# Altium PCB PCB1.PcbDoc (part 1 of 3)
Units mm, origin at the board's own origin, x right, y up, seen from the top; angles counter-clockwise.
Board outline 100 x 48 mm, 4 copper layers (Top Layer, Top GND, Bottom VM, Bottom Layer), stack 1.513 mm thick; 171 components, 136 nets, 609 pads, 571 vias.
Unrouted connection lines stored in the file: 44.
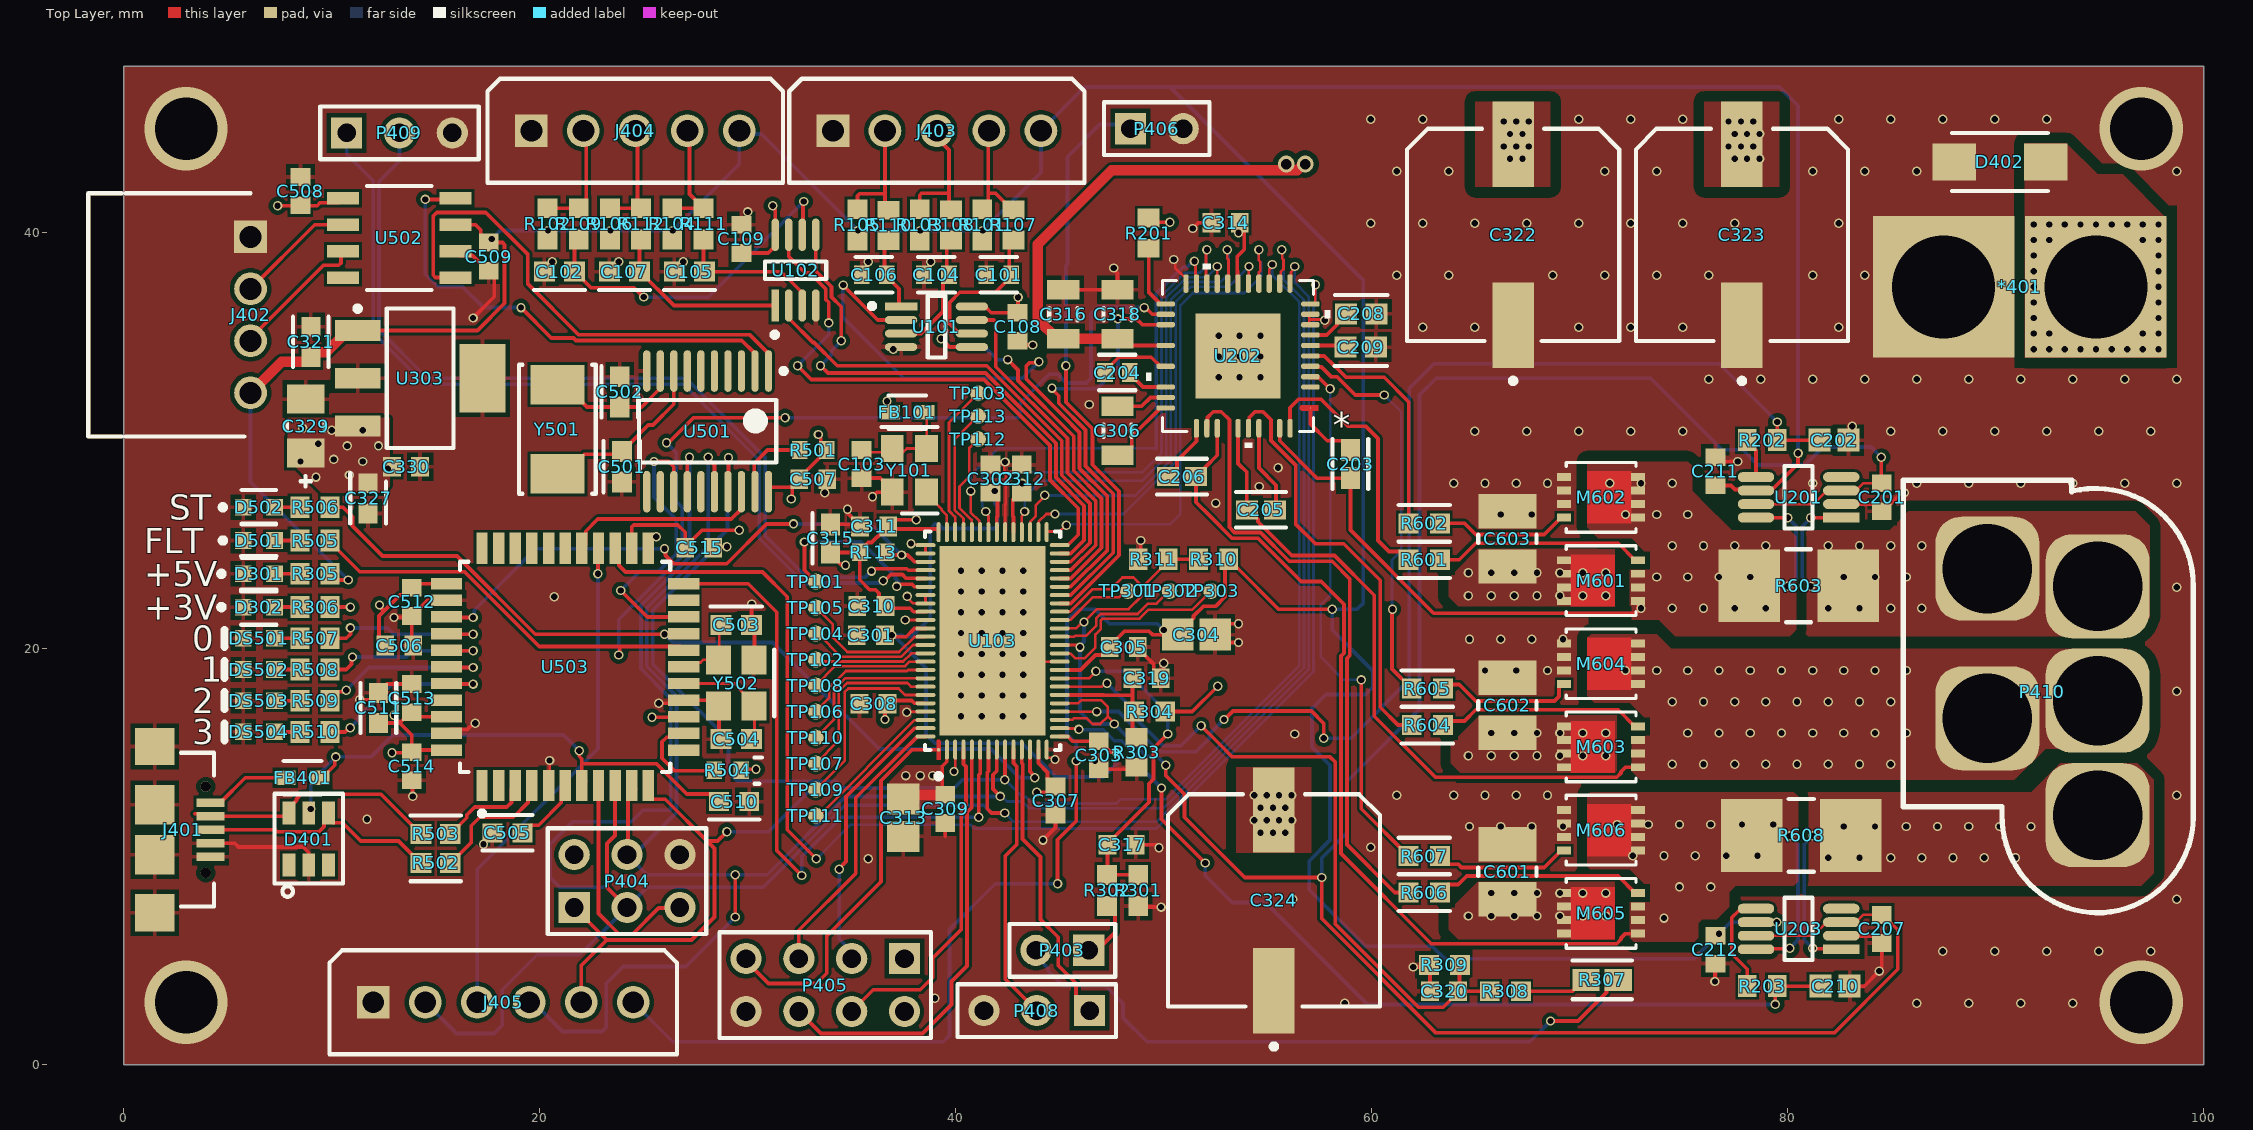
[diagram p0: Top Layer view]
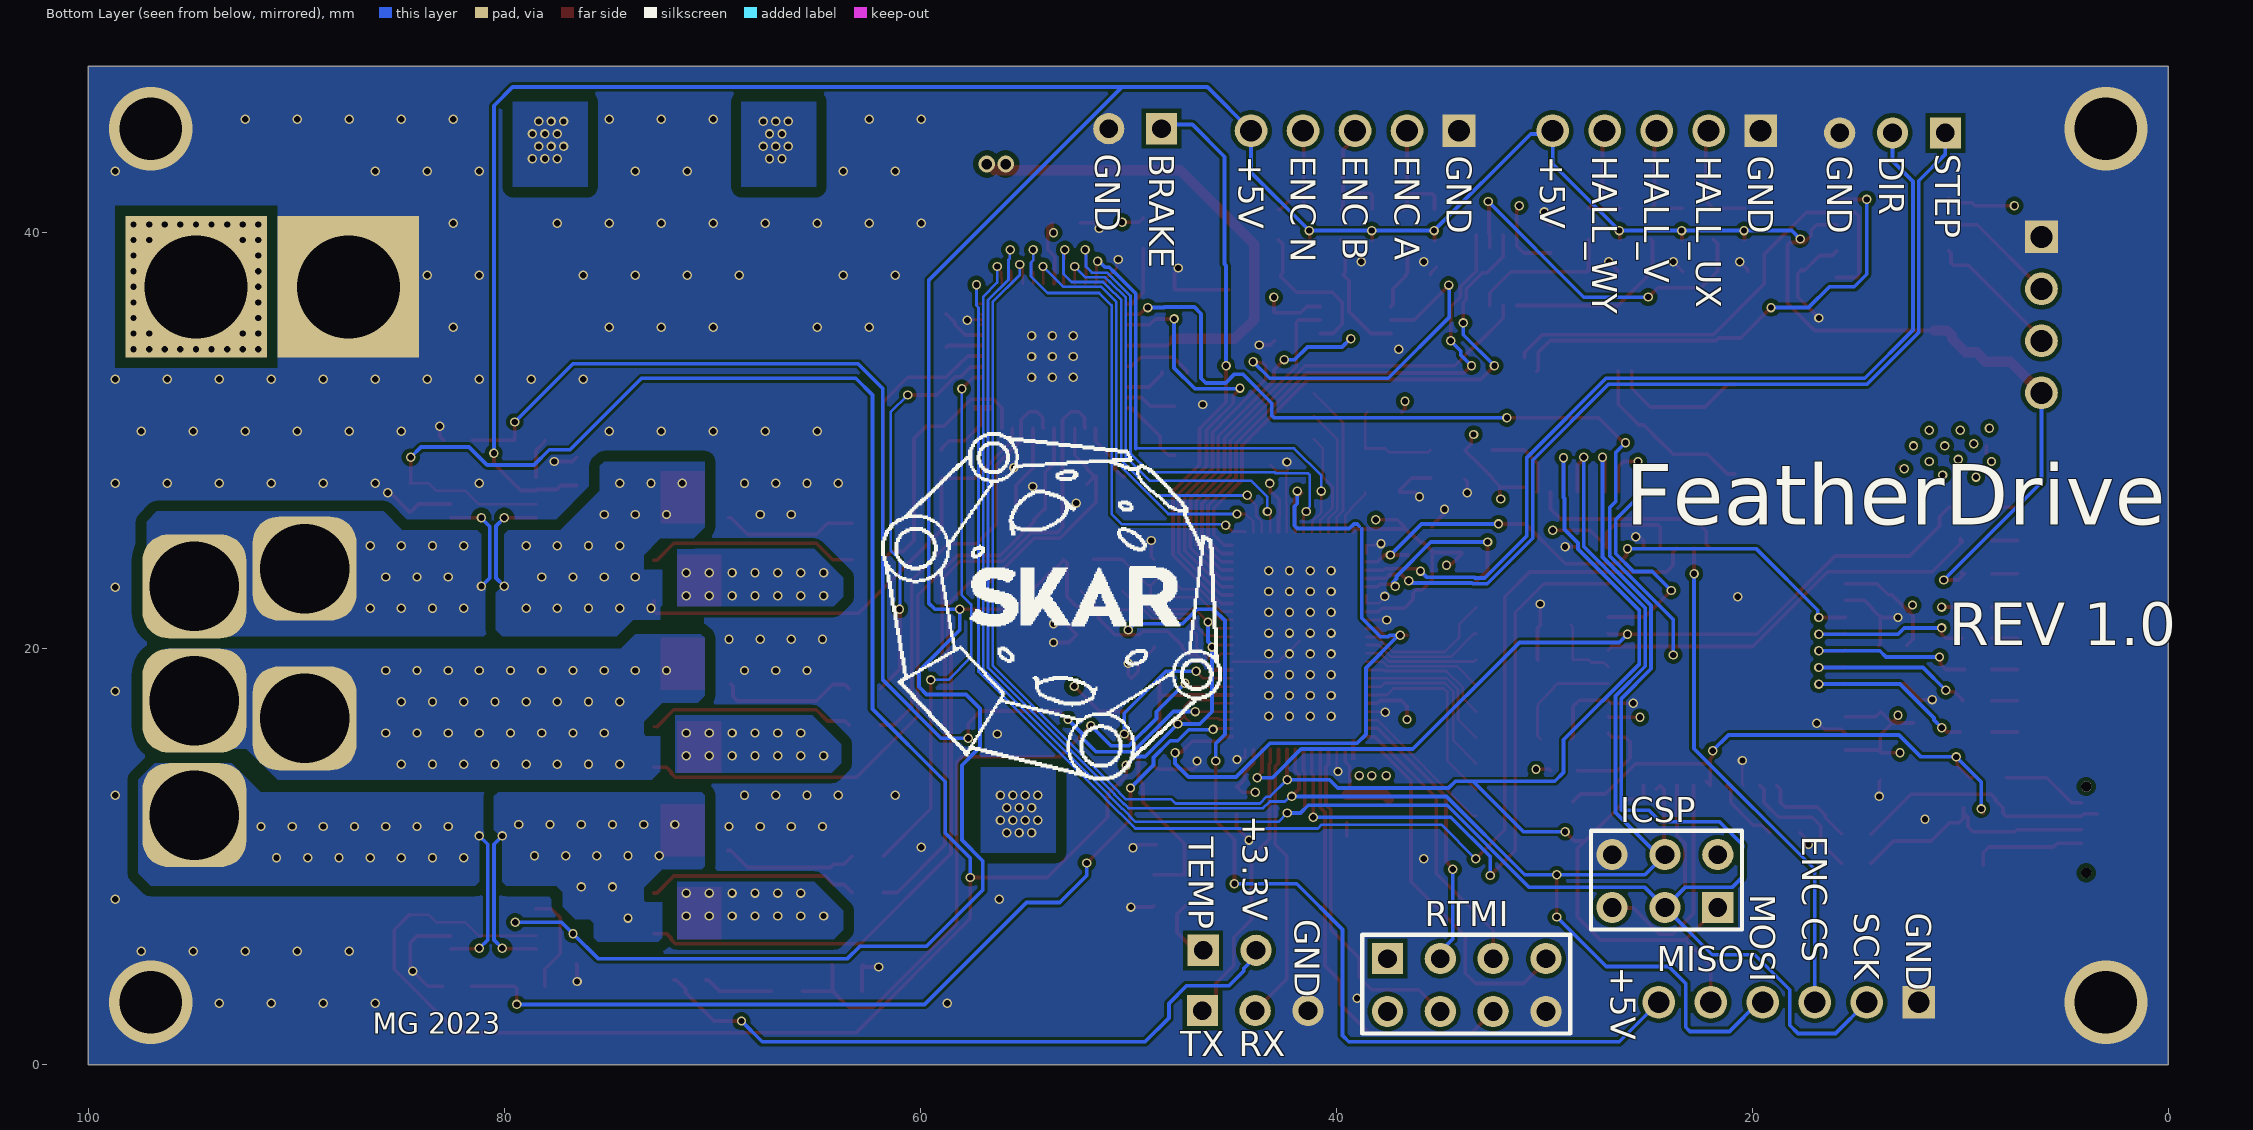
[diagram p1: Bottom Layer view, seen from below]
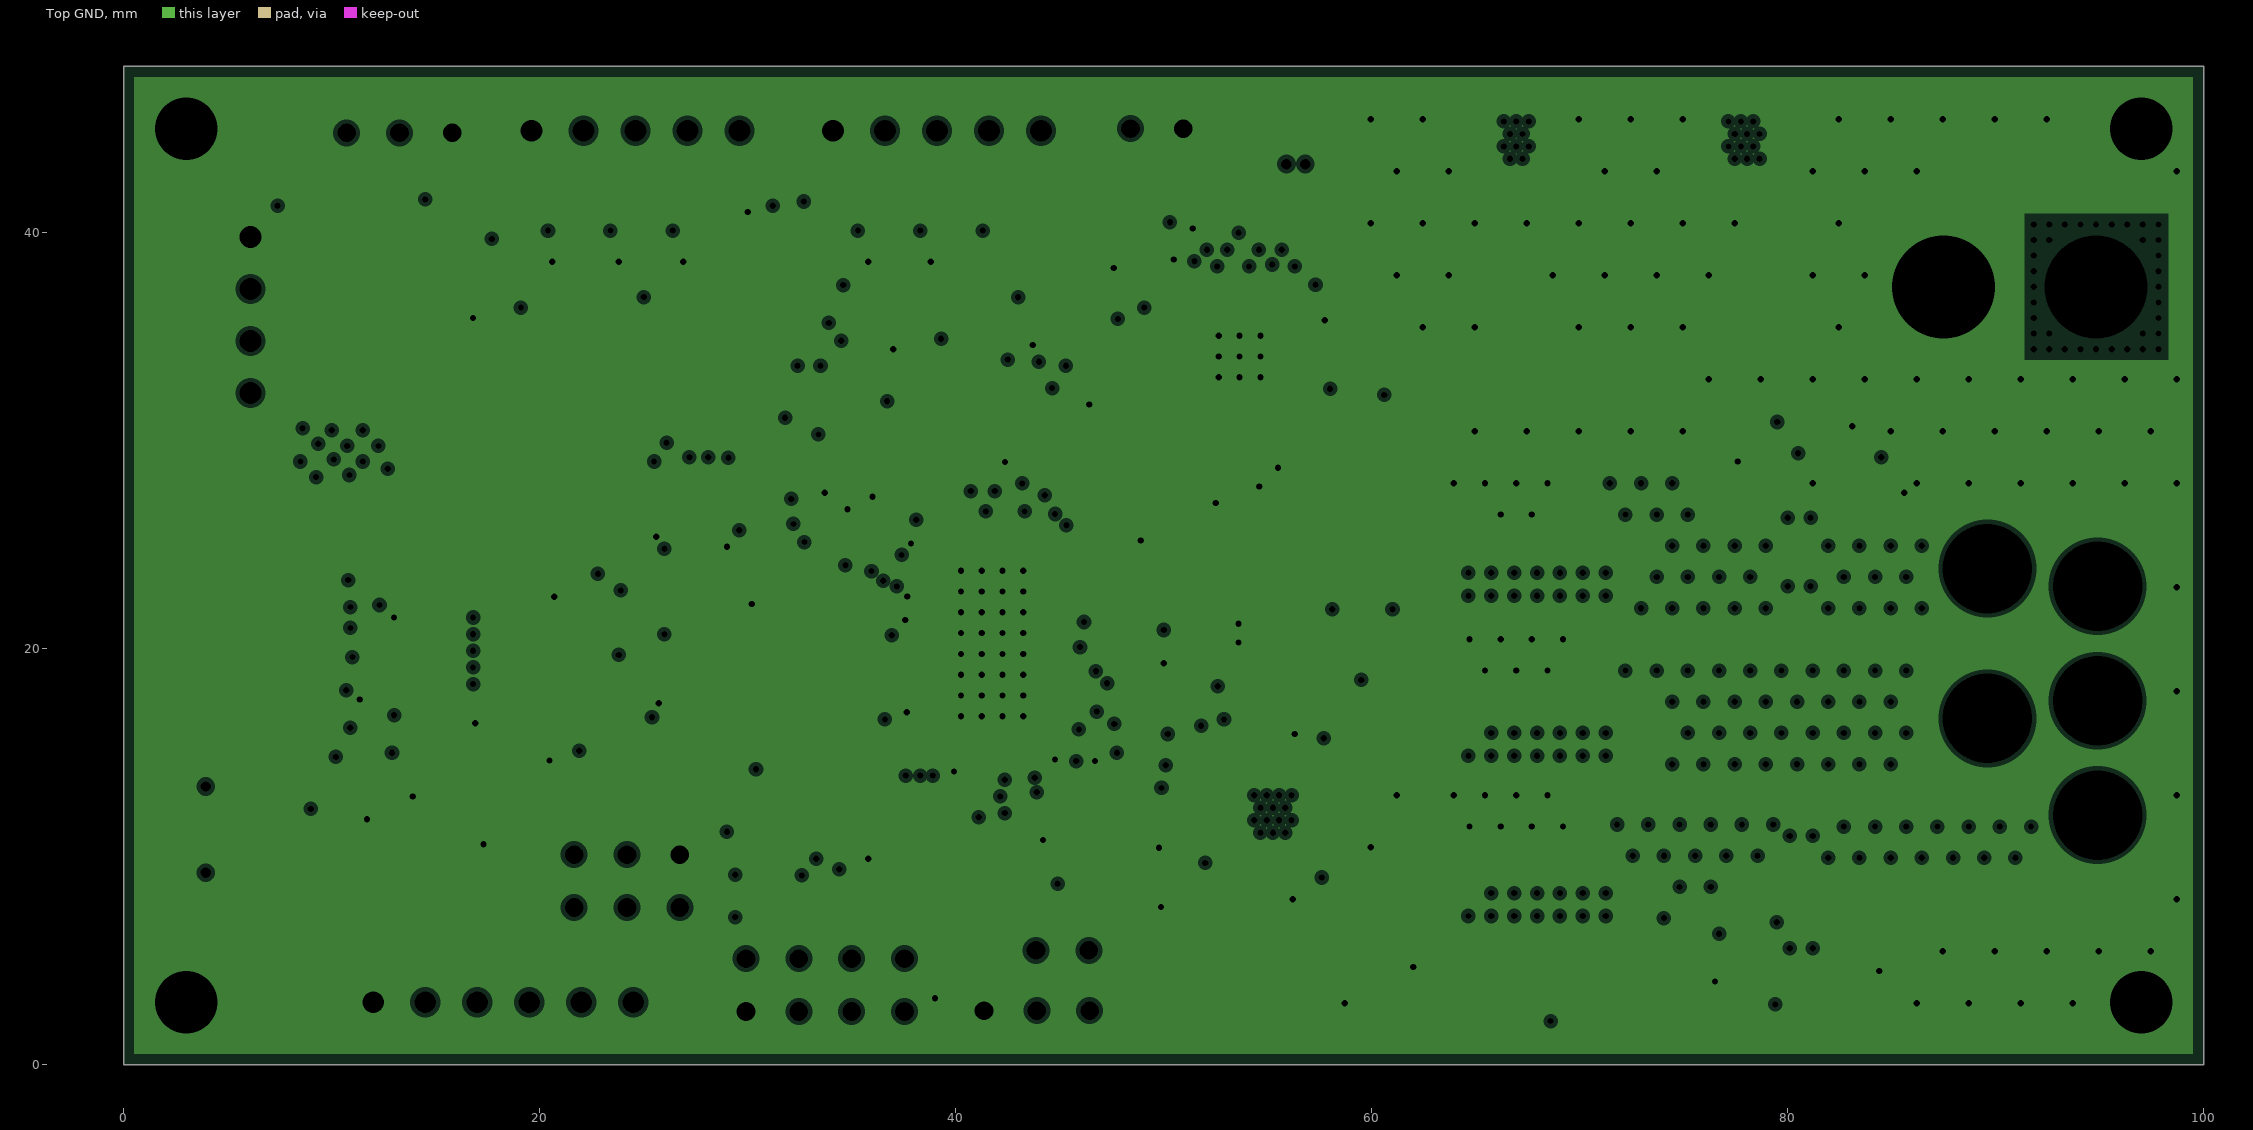
[diagram p2: Top GND, clearances drawn from the general rule]
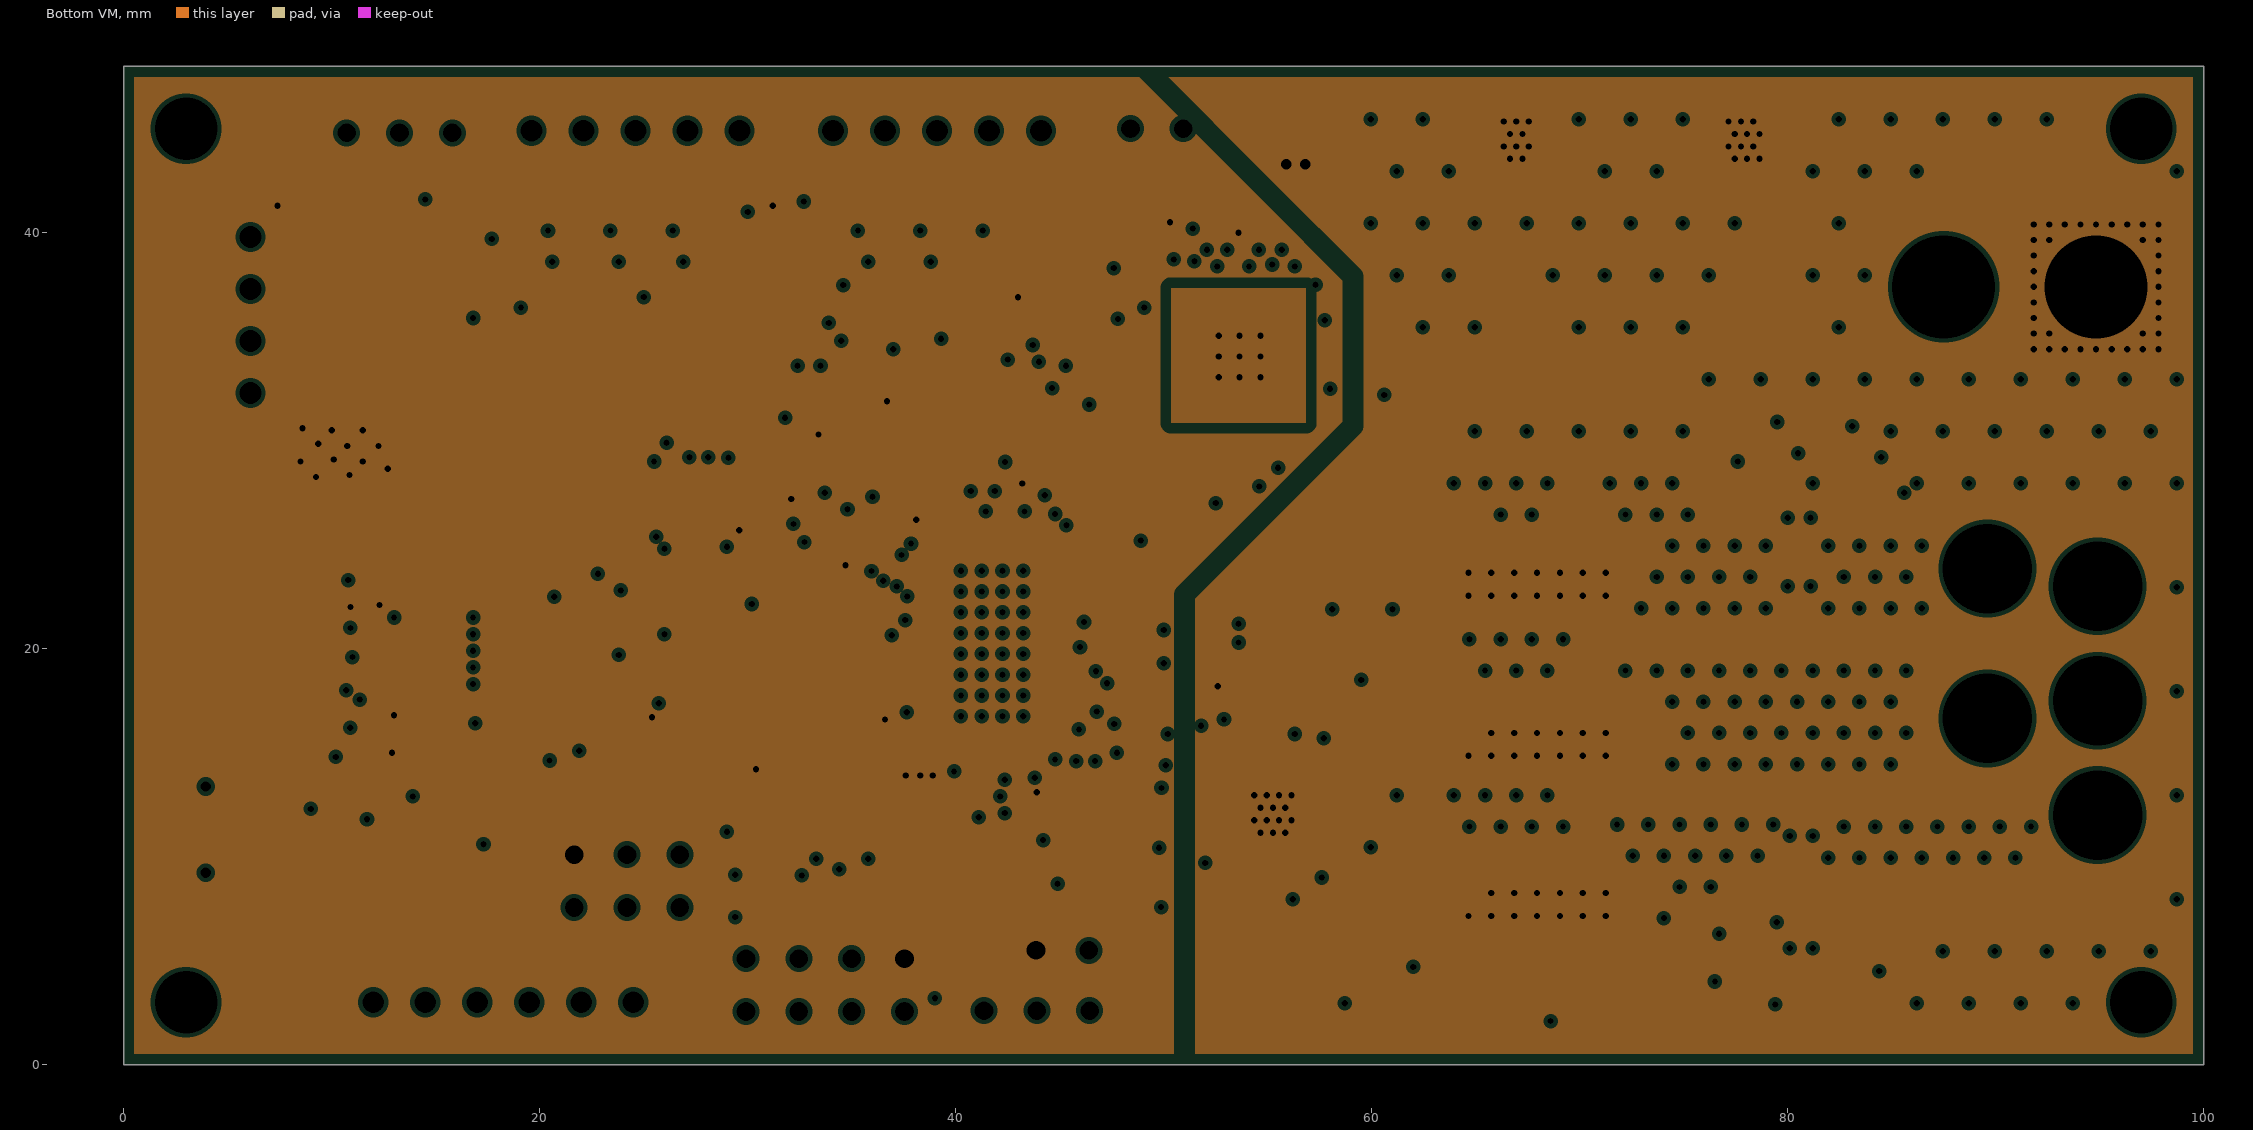
[diagram p3: Bottom VM, clearances drawn from the general rule]
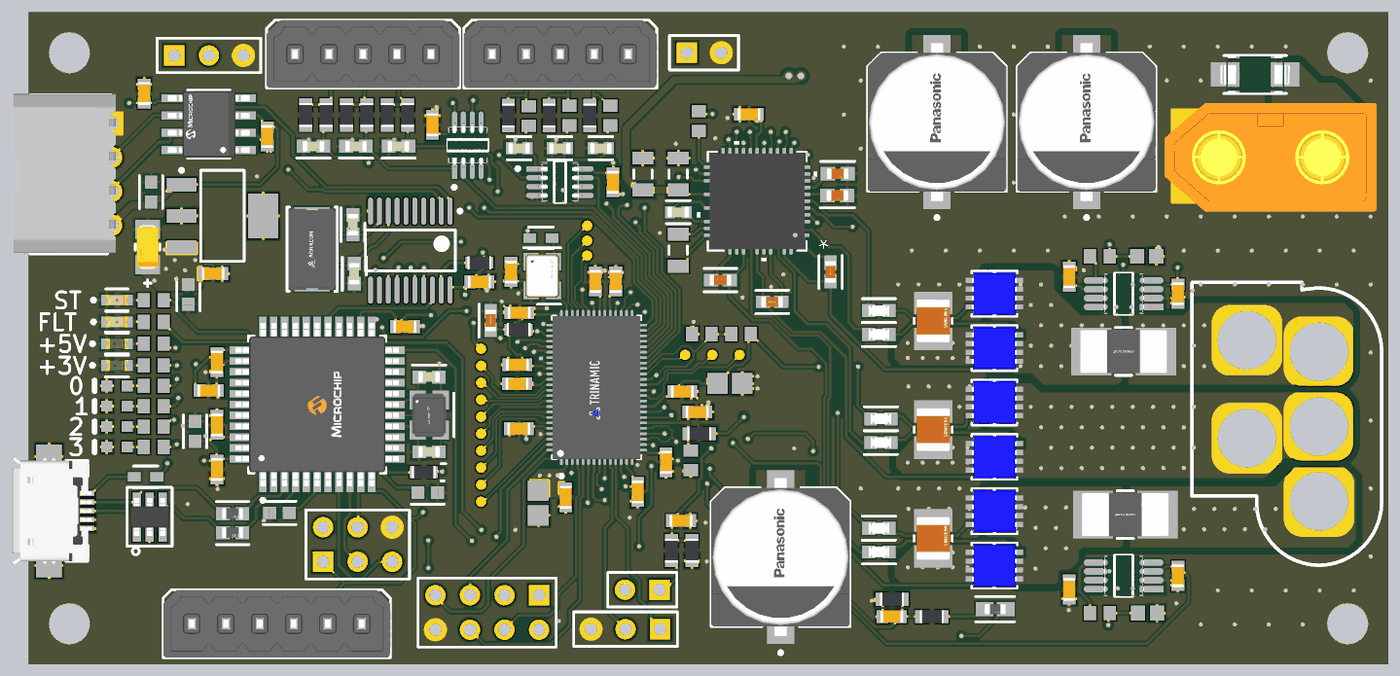
[diagram p6: 3D render of the assembled board from above, using the file's embedded part models]

## Layer stack, top to bottom
Top Solder: solder mask 0.0102, Solder Resist, Dk 3.5
Top Layer: signal copper 0.035
Dielectric 2: prepreg 0.2083, PP-022, Dk 4.5
Top GND: plane copper 0.018, net GND
Core: core 0.9906, Core-042, Dk 4.6
Bottom VM: plane copper 0.018, net (Multiple Nets)
Dielectric 3: prepreg 0.2083, PP-022, Dk 4.5
Bottom Layer: signal copper 0.035
Bottom Solder: solder mask 0.0102, Solder Resist, Dk 3.5

## Board outline
0,0 0,48 100,48 100,0

## Design rules (kind name [scope] priority, off if disabled: settings)
Clearance Clearance_POWER [(InNet('NetC205_2') OR InNet('NETC203_2') OR InNet('NETC206_2') OR InNet('NetP410_1') OR InNet('NetP410_3') OR InNet('VM'))] p1: gap=0.254 ignorepadtopadclearanceinfootprint=FALSE except(0: SMDPad-Hole THPad-Hole Via-Hole Fill-Hole Poly-Hole Region-Hole Text-Hole; 0.1: Arc-Arc Arc-Track Track-Track; 0.127: Arc-THPad Arc-Fill Arc-Poly Arc-Region Track-THPad Track-Fill Track-Poly Track-Region SMDPad-SMDPad; 0.2: Arc-SMDPad Track-SMDPad; 0.5: THPad-THPad THPad-Fill THPad-Poly THPad-Region Fill-Fill Fill-Poly Fill-Region Poly-Poly Poly-Region Region-Region)
Clearance [All] p2: gap=0.127 ignorepadtopadclearanceinfootprint=FALSE except(0: SMDPad-Hole THPad-Hole Via-Hole Fill-Hole Poly-Hole Region-Hole Text-Hole; 0.1: Arc-Arc Arc-Track Track-Track; 0.2: Arc-SMDPad Track-SMDPad THPad-Fill THPad-Poly THPad-Region Via-Fill Via-Poly Via-Region; 0.254: Arc-Via Arc-Text Arc-Hole Track-Via Track-Text Track-Hole SMDPad-THPad SMDPad-Via SMDPad-Text THPad-Via THPad-Text Via-Via Via-Text Fill-Text Poly-Text Region-Text Text-Text; 0.5: THPad-THPad)
ComponentClearance [All] p1: gap=0.127 collisioncheckmode=3 verticalgap=0.254 showdistances=FALSE
HoleSize [All] p1: absolutevalues=TRUE maxlimit=6.5 minlimit=0.025 maxpercent=80.000 minpercent=20.000
MinimumSolderMaskSliver [All] p1: minsoldermaskwidth=0.08
PlaneClearance [All] p1: clearance=0.2
PlaneConnect [All] p1: planeconnectstyle=Direct reliefexpansion=0.508 reliefentries=4 reliefconductorwidth=0.254 reliefairgap=0.254
PolygonConnect PolygonConnect_GND_POWER [InNet('GND') vs (HasFootprint('FP-FC-G-MFG') OR HasFootprint('FP-CL32-IPC_B') OR HasFootprint('TSON Advance_TOS') OR HasFootprint('XT60+MR60') OR HasFootprint('XT-60') OR HasFootprint('FP-SMAJ-CA-MFG') OR InNamedPolygon('GND_L01_P000'))] p1: connectstyle=Direct reliefconductorwidth=0.254 reliefentries=4 polygonreliefangle="90 Angle" airgapwidth=0.254
PolygonConnect PolygonConnect_GND [InNet('GND')] p2: thpad.connectstyle=Direct thpad.reliefconductorwidth=0.254 thpad.reliefentries=4 thpad.polygonreliefangle="90 Angle" thpad.airgapwidth=0.254 smdpad.connectstyle=Relief smdpad.reliefconductorwidth=0.2 smdpad.reliefentries=4 smdpad.polygonreliefangle="90 Angle" smdpad.airgapwidth=0.2 via.connectstyle=Direct via.reliefconductorwidth=0.254 via.reliefentries=4 via.polygonreliefangle="90 Angle" via.airgapwidth=0.254
PolygonConnect [All] p3: connectstyle=Direct reliefconductorwidth=0.254 reliefentries=4 polygonreliefangle="90 Angle" airgapwidth=0.254
RoutingVias [All] p1: holewidth=0.3 width=0.45 viastyle="Through Hole" minholewidth=0.3 minwidth=0.45 maxholewidth=0.55 maxwidth=0.7
SilkToSilkClearance [All] p1: silktosilkclearance=0
SilkToSolderMaskClearance [IsPad] p1: minsilkscreentomaskgap=0.15 clearancetoexposedcopper=TRUE
SolderMaskExpansion [All] p1: expansion=0.1 istentingtop=FALSE
Width Width_voltage [InNetClass('Voltage')] p1: maxlimit=0.5 minlimit=0.18 preferedwidth=0.18 minimp=50.000000 maximp=50.000000 favimp=50.000000
Width [All] p2: maxlimit=0.5 minlimit=0.127 preferedwidth=0.18 minimp=50.000000 maximp=50.000000 favimp=50.000000
23 further rules are at their usual default settings.

## Classes and differential pairs
component class Designator: C201 C202 C203 C204 C205 C206 C207 C208 C209 C210 C211 C212 R201 R202 R203 U201 U202 U203
component class Designator: C601 C602 C603 M601 M602 M603 M604 M605 M606 R601 R602 R603 R604 R605 R606 R607 R608
component class Designator: C101 C102 C103 C104 C105 C106 C107 C108 C109 FB101 R101 R102 R103 R104 R105 R106 R107 R108 R109 R110 R111 R112 R113 TP101 TP102 TP103 TP104 TP105 TP106 TP107 TP108 TP109 TP110 TP111 TP112 TP113 U101 U102 U103 Y101

## Components (designator, comment, footprint, x,y, rotation, side; value= is the part's Value field where it differs from the comment)
*401 "XT-60 Connector" XT-60 99.209,41.439 r180 top
C101 "1nF" FP-C0603C-CF-MFG 42.077,37.977 r180 top value="1,000 pF"
C102 "100pF" FP-C0603C-CF-IPC_B 20.951,38.127 r180 top value="100 pF"
C103 "100nF" CAPC1608X90X35NL10T15 35.477,28.877 r270 top
C104 "1nF" FP-C0603C-CF-MFG 39.077,37.977 r180 top value="1,000 pF"
C105 "100pF" FP-C0603C-CF-IPC_B 27.203,38.127 r180 top value="100 pF"
C106 "1nF" FP-C0603C-CF-MFG 36.077,37.977 r180 top value="1,000 pF"
C107 "100pF" FP-C0603C-CF-IPC_B 24.077,38.127 r180 top value="100 pF"
C108 "100nF" CAPC1608X90X35NL10T15 42.977,35.477 r270 top
C109 "100nF" CAPC1608X90X35NL10T15 29.7,39.7 r90 top
C201 "100nF" CAPC1608X90X35NL10T15 84.527,27.277 r270 top
C202 "2.2nF" CAPC1608X95X40ML15T15 82.227,30.027 r180 top
C203 "470nF" FP-0603-L_1_6_0_1-W_0_8_0-IPC_B 58.977,28.877 r270 top
C204 "22nF" FP-C0603C-CF-MFG 47.777,33.277 r180 top value="22,000 pF"
C205 "470nF" FP-0603-L_1_6_0_1-W_0_8_0-IPC_B 54.677,26.677 r180 top
C206 "470nF" FP-0603-L_1_6_0_1-W_0_8_0-IPC_B 50.877,28.277 r0 top
C207 "100nF" CAPC1608X90X35NL10T15 84.527,6.527 r270 top
C208 "2.2uF" FP-0603-L_1_6_0_2-W_0_8_0-IPC_B 59.5,36.1 r0 top
C209 "2.2uF" FP-0603-L_1_6_0_2-W_0_8_0-IPC_B 59.473,34.5 r0 top
C210 "2.2nF" CAPC1608X95X40ML15T15 82.277,3.777 r180 top
C211 "100nF" CAPC1608X90X35NL10T15 76.527,28.527 r90 top
C212 "100nF" CAPC1608X90X35NL10T15 76.527,5.527 r270 top
C301 "100nF" CAPC1608X90X35NL10T15 35.925,20.65 r0 top
C302 "100nF" CAPC1608X90X35NL10T15 41.677,28.177 r270 top
C303 "100nF" CAPC1608X90X35NL10T15 46.877,14.877 r90 top
C304 "4.7uF" CAPC2013X145X50ML20T25 51.577,20.677 r180 top
C305 "100nF" CAPC1608X90X35NL10T15 48.077,20.077 r180 top
C306 "100nF" CAPC2013X145X20ML20 47.777,30.477 r90 top
C307 "100nF" CAPC1608X90X35NL10T15 44.8,12.7 r90 top
C308 "100nF" CAPC1608X90X35NL10T15 36.05,17.35 r0 top
C309 "100nF" CAPC1608X90X35NL10T15 39.5,12.3 r90 top
C310 "100nF" CAPC1608X90X35NL10T15 35.95,22.05 r0 top
C311 "100nF" CAPC1608X90X35NL10T15 36.077,25.877 r0 top
C312 "100nF" CAPC1608X90X35NL10T15 43.177,28.177 r270 top
C313 "4.7uF" CAPC2013X145X50ML20T25 37.477,11.877 r90 top
C314 "100nF" CAPC1608X90X35NL10T15 52.977,40.477 r0 top
C315 "470nF" FP-0603-L_1_6_0_1-W_0_8_0-IPC_B 33.977,25.304 r270 top
C316 "100nF" CAPC2013X145X20ML20 45.177,36.077 r90 top
C317 "100nF" CAPC1608X90X35NL10T15 47.977,10.577 r180 top
C318 "100nF" CAPC2013X145X20ML20 47.777,36.077 r90 top
C319 "100nF" CAPC1608X90X35NL10T15 49.177,18.577 r180 top
C320 "100nF" CAPC1608X90X35NL10T15 63.477,3.527 r0 top
C321 "1uF" FP-CL10-IPC_B 9,34.75 r90 top
C322 "390uF" FP-FC-G-MFG 66.8,39.9 r90 top locked
C323 "390uF" FP-FC-G-MFG 77.8,39.9 r90 top locked
C324 "390uF" FP-FC-G-MFG 55.3,7.9 r90 top locked
C327 "1uF" FP-CL10-IPC_B 11.75,27.227 r270 top
C329 "10uF" FP-TAJA-MFG 8.75,30.7 r270 top
C330 "100nF" CAPC1608X90X35NL10T15 13.575,28.75 r180 top
C501 "18pF" FP-C0603C-CF-IPC_B 23.95,28.75 r90 top value="18 pF"
C502 "18pF" FP-C0603C-CF-IPC_B 23.85,32.35 r90 top value="18 pF"
C503 "18pF" FP-C0603C-CF-IPC_B 29.45,21.15 r0 top value="18 pF"
C504 "18pF" FP-C0603C-CF-IPC_B 29.45,15.65 r180 top value="18 pF"
C505 "1uF" FP-CL10-IPC_B 18.45,11.15 r0 top
C506 "100nF" CAPC1608X90X35NL10T15 13.25,20.15 r0 top
C507 "100nF" CAPC1608X90X35NL10T15 33.15,28.15 r180 top
C508 "100nF" CAPC1608X90X35NL10T15 8.5,42 r270 top
C509 "100nF" CAPC1608X90X35NL10T15 17.55,38.85 r90 top
C510 "1uF" FP-CL10-IPC_B 29.35,12.65 r0 top
C511 "1uF" FP-CL10-IPC_B 12.25,17.15 r90 top
C512 "100nF" CAPC1608X90X35NL10T15 13.85,22.25 r90 top
C513 "100nF" CAPC1608X90X35NL10T15 13.85,17.625 r270 top
C514 "100nF" CAPC1608X90X35NL10T15 13.85,14.35 r90 top
C515 "100nF" CAPC1608X90X35NL10T15 27.675,24.85 r180 top
C601 "2.2uF" FP-CL32-IPC_B 66.527,9.277 r90 top
C602 "2.2uF" FP-CL32-IPC_B 66.527,17.277 r90 top
C603 "2.2uF" FP-CL32-IPC_B 66.527,25.277 r90 top
D301 "GREEN" FP-LTST-C190GKT-MFG 6.5,23.6 r0 top
D302 "GREEN" FP-LTST-C190GKT-MFG 6.5,22 r0 top
D401 "824001" SOT23_6L 8.9,10.85 r90 top
D402 "SMAJ36CA" FP-SMAJ-CA-MFG 90.2,43.4 r0 top
D501 "RED" FP-LTST-C190KRKT-MFG 6.5,25.2 r0 top
D502 "RED" FP-LTST-C190KRKT-MFG 6.5,26.8 r0 top
DS501 "LTST-C190TBKT" LTST-C190TBKT-2_V 6.5,20.5 r180 top
DS502 "LTST-C190TBKT" LTST-C190TBKT-2_V 6.5,19 r180 top
DS503 "LTST-C190TBKT" LTST-C190TBKT-2_V 6.5,17.5 r180 top
DS504 "LTST-C190TBKT" LTST-C190TBKT-2_V 6.5,16 r180 top
FB101 "600R" FP-742792651-MFG 37.677,31.377 r0 top
FB401 "600R" FP-742792651-MFG 8.6,13.8 r180 top
J401 "629105136821" 629105136821 1.5,11.3 r270 top
J402 "CAN" SHDRRA4W60P0X250_1X4_1170X750X510P 6.1,39.8 r90 top
J403 "ENCODER" PTSM5 34.1,44.9 r180 top
J404 "HALL" PTSM5 19.6,44.9 r180 top
J405 "ENC_SPI" PTSM6 12,3 r180 top
M601 "TPN19008QM" "TSON Advance_TOS" 71.027,23.277 r180 top locked
M602 "TPN19008QM" "TSON Advance_TOS" 71.027,27.277 r0 top locked
M603 "TPN19008QM" "TSON Advance_TOS" 71.027,15.277 r180 top locked
M604 "TPN19008QM" "TSON Advance_TOS" 71.027,19.277 r0 top locked
M605 "TPN19008QM" "TSON Advance_TOS" 71.027,7.277 r180 top locked
M606 "TPN19008QM" "TSON Advance_TOS" 71.027,11.277 r0 top locked
P403 "TEMP" HDR1X2 46.4,5.5 r180 top
P404 "ICSP" HDR2X3 21.66,7.56 r0 top
P405 "DEBUG" HDR2X4 37.54,5.1 r180 top
P406 "BRAKE" HDR1X2 48.4,45 r0 top
P408 "UART" HDR1X3 46.44,2.6 r180 top
P409 "STEP" HDR1X3 10.72,44.8 r0 top
P410 "XT60+MR60" XT60+MR60 94.9,17.5 r270 top locked
R101 "4.7k" RESC1608X55X30NL15T15 41.277,40.377 r270 top
R102 "4.7k" RESC1608X55X30NL15T15 20.377,40.427 r270 top
R103 "4.7k" RESC1608X55X30NL15T15 38.277,40.377 r270 top
R104 "4.7k" RESC1608X55X30NL15T15 26.377,40.427 r270 top
R105 "4.7k" RESC1608X55X30NL15T15 35.277,40.377 r270 top
R106 "4.7k" RESC1608X55X30NL15T15 23.377,40.427 r270 top
R107 "1k" RESC1608X55X30ML15T15 42.777,40.377 r270 top
R108 "1k" RESC1608X55X30ML15T15 39.777,40.377 r270 top
R109 "4.7k" RESC1608X55X30NL15T15 21.877,40.427 r90 top
R110 "1k" RESC1608X55X30ML15T15 36.777,40.352 r270 top
R111 "4.7k" RESC1608X55X30NL15T15 27.877,40.427 r90 top
R112 "4.7k" RESC1608X55X30NL15T15 24.877,40.427 r90 top
R113 "10K" RESC1609X55X30LL15T15 36.035,24.635 r180 top
R201 "1k" RESC1608X55X30ML15T15 49.277,39.977 r90 top
R202 "1k" RESC1608X55X30ML15T15 78.777,30.027 r0 top
R203 "1k" RESC1608X55X30ML15T15 78.777,3.777 r0 top
R301 "4.7K" RESC1608X55X30NL15T15 48.777,8.377 r90 top
R302 "4.7K" RESC1608X55X30NL15T15 47.277,8.377 r270 top
R303 "1k" RESC1608X55X30ML15T15 48.7,15.025 r90 top
R304 "47K" RESC1608X55X30NL15T15 49.327,16.977 r0 top
R305 "1k" RESC1608X55X30ML15T15 9.2,23.6 r0 top
R306 "1k" RESC1608X55X30ML15T15 9.2,22 r0 top
R307 "10K NTC" FP-NCP18-0_15-IPC_A 71.077,4.077 r0 top
R308 "4.7K" RESC1608X55X30NL15T15 66.427,3.527 r0 top
R309 "4.7K" RESC1608X55X30NL15T15 63.5,4.8 r0 top
R310 "1k" RESC1608X55X30ML15T15 52.4,24.3 r0 top
R311 "1k" RESC1608X55X30ML15T15 49.5,24.3 r0 top
R501 "10K" RESC1609X55X30LL15T15 33.15,29.55 r0 top
R502 "22R" FP-RMCF0603-IPC_B 15,9.7 r0 top
R503 "22R" FP-RMCF0603-IPC_B 15,11.1 r0 top
R504 "10K" RESC1609X55X30LL15T15 29.05,14.15 r0 top
R505 "1k" RESC1608X55X30ML15T15 9.2,25.2 r0 top
R506 "1k" RESC1608X55X30ML15T15 9.2,26.8 r0 top
R507 "1k" RESC1608X55X30ML15T15 9.2,20.5 r0 top
R508 "1k" RESC1608X55X30ML15T15 9.2,19 r0 top
R509 "1k" RESC1608X55X30ML15T15 9.2,17.5 r0 top
R510 "1k" RESC1608X55X30ML15T15 9.2,16 r0 top
R601 "10R" FP-ERJ3EK-IPC_B 62.526,24.277 r0 top value=10Ω
R602 "10R" FP-ERJ3EK-IPC_B 62.527,26.027 r0 top value=10Ω
R603 "R003" FP-CRE2512-R001-R004-IPC_A 80.527,23.027 r0 top locked
R604 "10R" FP-ERJ3EK-IPC_B 62.677,16.327 r0 top value=10Ω
R605 "10R" FP-ERJ3EK-IPC_B 62.677,18.077 r0 top value=10Ω
R606 "10R" FP-ERJ3EK-IPC_B 62.527,8.277 r0 top value=10Ω
R607 "10R" FP-ERJ3EK-IPC_B 62.527,10.027 r0 top value=10Ω
R608 "R003" FP-CRE2512-R001-R004-IPC_A 80.653,11.027 r0 top locked
TP101 "TestPoint" PCBComponent_1#1 33.277,23.227 r270 top locked
TP102 "TestPoint" PCBComponent_1#1 33.277,19.477 r90 top locked
TP103 "TestPoint" PCBComponent_1#1 41.077,32.277 r90 top locked
TP104 "TestPoint" PCBComponent_1#1 33.277,20.727 r90 top locked
TP105 "TestPoint" PCBComponent_1#1 33.277,21.977 r90 top locked
TP106 "TestPoint" PCBComponent_1#1 33.277,16.977 r90 top locked
TP107 "TestPoint" PCBComponent_1#1 33.277,14.477 r90 top locked
TP108 "TestPoint" PCBComponent_1#1 33.277,18.227 r270 top locked
TP109 "TestPoint" PCBComponent_1#1 33.277,13.227 r90 top locked
TP110 "TestPoint" PCBComponent_1#1 33.277,15.727 r90 top locked
TP111 "TestPoint" PCBComponent_1#1 33.277,11.977 r270 top locked
TP112 "TestPoint" PCBComponent_1#1 41.077,30.077 r90 top locked
TP113 "TestPoint" PCBComponent_1#1 41.077,31.177 r90 top locked
TP301 "TestPoint" PCBComponent_1#1 48.277,22.777 r90 top locked
TP302 "TestPoint" PCBComponent_1#2 50.277,23.377 r90 top locked
TP303 "TestPoint" PCBComponent_1#3 51.777,23.277 r90 top locked
U101 "SN74LVC3G17DCTR" FP-DCT0008A-IPC_B 39.077,35.477 r0 top
U102 "SN74LVC3G17DCTR" FP-DCT0008A-IPC_B 32.3,38.2 r90 top
U103 "TMC4671-LA" FP-TMC4671-LA-IPC_A 41.777,20.377 r90 top locked
U201 "AD8418BRMZ" FP-RM-8-IPC_B 80.527,27.277 r180 top
U202 "TMC6100-LA" QFN37_7X7_TRI-M 53.577,34.077 r180 top locked
U203 "AD8418BRMZ" FP-RM-8-IPC_B 80.527,6.527 r180 top
U303 "TC1262-3.3VDBTR" SOT-223-DB3_N 14.25,33 r0 top
U501 "MCP2515-I/ST" TSSOP-ST20_M 28.075,30.45 r270 top
U502 "MCP2562FDT-E/SN" FP-C04-057-SN-MFG 13.25,39.75 r180 top
U503 "ATMEGA32U4RC-AUR" FP-ML-MFG 21.227,19.127 r90 top locked
Y101 "ASE-25.000MHZ-LR-T" FP-ASE-MFG 37.777,28.577 r270 top
Y501 "8MHz" FP-ABM7-MFG 20.85,30.55 r90 top
Y502 "16MHz" FP-ABM8G-MFG 29.45,18.35 r270 top

## Footprints (in the part's own frame and the unit in brackets; to place one, negate y for a bottom-side part, rotate by r counter-clockwise, add the part's x,y. Pads: shape width x height; smd on the part's side, far side on the other; paste and mask are expansions set on the pad)
629105136821 [mm] "Micro USB 2.0 SMT Type B Horizontal 5 Contacts"
  rect 0.4x1.35 smd: 1(-1.3,2.675) 2(-0.65,2.675) 3(0,2.675) 4(0.65,2.675) 5(1.3,2.675)
  round 0.5 hole 0.5 unplated: MH1(-2.075,2.45) MH2(2.075,2.45)
  rect 1.8x1.9 smd: Shell(-4,0) Shell(4,0)
  rect 1.9x1.9 smd: Shell(-1.2,0) Shell(1.2,0)
  silkscreen extent -3.7,1.25 3.7,2.85, body extent -4,-2.73 4,3.17, height 2.69
CAPC1608X90X35NL10T15 [mm] "Chip Capacitor, 2-Leads, Body 1.7x0.9mm, IPC Medium Density"
  rect 0.85x0.95 smd: 1(-0.675,0) 2(0.675,0)
  body extent -0.85,-0.45 0.85,0.45, height 0.9
CAPC1608X95X40ML15T15 [mm] "Chip Capacitor, 2-Leads, Body 1.60x0.80mm, IPC Low Density"
  rect 1.05x1.1 smd: 1(-0.7,0) 2(0.7,0)
  body extent -0.88,-0.48 0.87,0.47, height 0.95
CAPC2013X145X20ML20 [mm] "Chip Capacitor, 2-Leads, Body 2.20x1.45mm, IPC Low Density"
  rect 0.95x1.55 smd: 1(-1.175,0) 2(1.175,0)
  silkscreen extent -0.3,-0.68 0.3,0.68, body extent -1.1,-0.72 1.1,0.72, height 1.45
CAPC2013X145X50ML20T25 [mm] "Chip Capacitor, 2-Leads, Body 2.00x1.25mm, IPC Low Density"
  rect 1.5x1.55 smd: 1(-0.9,0) 2(0.9,0)
  body extent -1.1,-0.72 1.1,0.72, height 1.45
FP-0603-L_1_6_0_1-W_0_8_0-IPC_B [mm]
  rect 1.058x0.912 smd paste+0 mask+0: 1(-0.677,0) 2(0.677,0)
  silkscreen extent -1.21,-0.86 1.21,0.86, body extent -1.46,-0.71 1.46,0.71, height 0.25
FP-0603-L_1_6_0_2-W_0_8_0-IPC_B [mm]
  rect 1.058x1.012 smd paste+0 mask+0: 1(-0.727,0) 2(0.727,0)
  silkscreen extent -1.26,0.91 1.26,0.91, body extent -1.51,-0.76 1.51,0.76, height 0.25
FP-742792651-MFG [mm]
  rect 0.95x0.7 smd paste+0 mask+0: 1(-0.825,0) 2(0.825,0)
  silkscreen extent -0.9,-0.8 0.9,0.8
FP-ABM7-MFG [mm]
  rect 1.9x2.6 smd paste+0 mask+0: 1(-2.15,0) 2(2.15,0)
  silkscreen extent -3.1,-1.85 3.1,1.85, body extent -3.2,-1.95 3.2,1.95, height 0.25
FP-ABM8G-MFG [mm]
  rect 1.4x1.2 smd paste+0 mask+0: 1(-1.1,-0.85) 2(1.1,-0.85) 3(1.1,0.85) 4(-1.1,0.85)
  silkscreen extent -1.6,1.82 1.6,1.82, body extent -1.9,-1.55 1.9,1.55, height 0.25
FP-ASE-MFG [mm]
  rect 1.3x1.1 smd paste+0 mask+0: 1(-1.05,-0.825) 2(1.05,-0.825) 3(1.05,0.825) 4(-1.05,0.825)
  silkscreen extent -2.07,-1.35 2.08,1.35, body extent -1.8,-1.48 1.8,1.48, height 0.25
FP-C04-057-SN-MFG [mm]
  rect 1.55x0.6 smd paste+0 mask+0: 1(-2.7,1.905) 2(-2.7,0.635) 3(-2.7,-0.635) 4(-2.7,-1.905) 5(2.7,-1.905) 6(2.7,-0.635) 7(2.7,0.635) 8(2.7,1.905)
  silkscreen extent -1.55,-2.5 1.55,2.5, body extent -3.57,-2.75 3.57,2.75, height 0.25
FP-C0603C-CF-IPC_B [mm]
  rect 1.007x0.958 smd paste+0 mask+0: 1(-0.726,0) 2(0.726,0)
  silkscreen extent -1.23,0.88 1.23,0.88, body extent -1.48,-0.73 1.48,0.73, height 0.25
FP-C0603C-CF-MFG [mm]
  rect 0.75x0.9 smd paste+0 mask+0: 1(-0.6,0) 2(0.6,0)
  silkscreen extent -0.87,-0.85 0.88,0.85, body extent -1.2,-0.6 1.2,0.6, height 0.25
FP-CL10-IPC_B [mm]
  rect 0.958x0.912 smd paste+0 mask+0: 1(-0.727,0) 2(0.727,0)
  silkscreen extent -1.21,-0.86 1.21,0.86, body extent -1.46,-0.71 1.46,0.71, height 0.25
FP-CL32-IPC_B [mm]
  rect 1.653x2.804 smd paste+0 mask+0: 1(-1.325,0) 2(1.325,0)
  silkscreen extent -0.2,-1.4 0.2,1.4, body extent -2.4,-1.65 2.4,1.65, height 0.25
FP-CRE2512-R001-R004-IPC_A [mm]
  rect 2.955x3.506 smd paste+0 mask+0: 1(-2.376,0) 2(2.376,0)
  silkscreen extent -0.6,-1.75 0.6,1.75, body extent -4.35,-2.25 4.35,2.25, height 0.25
FP-DCT0008A-IPC_B [mm]
  rect 1.554x0.376 smd paste+0 mask+0: 1(-1.7,0.975)
  rrect100% 1.554x0.376 smd paste+0 mask+0: 2(-1.7,0.325) 3(-1.7,-0.325) 4(-1.7,-0.975) 5(1.7,-0.975) 6(1.7,-0.325) 7(1.7,0.325) 8(1.7,0.975)
  silkscreen extent -3.23,-1.48 0.42,1.47, body extent -2.73,-1.73 2.73,1.73, height 0.25
FP-ERJ3EK-IPC_B [mm]
  rect 0.957x0.962 smd paste+0 mask+0: 1(-0.751,0) 2(0.751,0)
  silkscreen extent -1.23,-0.88 1.23,0.88, body extent -1.48,-0.73 1.48,0.73, height 0.25
FP-FC-G-MFG [mm]
  rect 4.1x2 smd paste+0 mask+0: 1(-4.35,0) 2(4.35,0)
  silkscreen extent -7.15,-5.1 5.1,5.1, body extent -6.65,-5.35 6.65,5.35, height 0.25
FP-LTST-C190GKT-MFG [mm]
  rect 0.8x0.8 smd paste+0 mask+0: 1(-0.75,0) 2(0.75,0)
  silkscreen extent -1.92,-0.85 0.85,0.85, body extent -1.25,-0.55 1.25,0.55, height 0.25
FP-LTST-C190KRKT-MFG [mm]
  rect 0.8x0.8 smd paste+0 mask+0: 1(-0.75,0) 2(0.75,0)
  silkscreen extent -1.85,-0.83 0.82,0.83, body extent -1.25,-0.55 1.25,0.55, height 0.25
FP-ML-MFG [mm]
  rect 1.5x0.55 smd paste+0 mask+0: 1(-5.7,4) 2(-5.7,3.2) 3(-5.7,2.4) 4(-5.7,1.6) 5(-5.7,0.8) 6(-5.7,0) 7(-5.7,-0.8) 8(-5.7,-1.6) 9(-5.7,-2.4) 10(-5.7,-3.2) 11(-5.7,-4) 23(5.7,-4) 24(5.7,-3.2) 25(5.7,-2.4) 26(5.7,-1.6) 27(5.7,-0.8) 28(5.7,0) 29(5.7,0.8) 30(5.7,1.6) 31(5.7,2.4) 32(5.7,3.2) 33(5.7,4)
  rect 0.55x1.5 smd paste+0 mask+0: 12(-4,-5.7) 13(-3.2,-5.7) 14(-2.4,-5.7) 15(-1.6,-5.7) 16(-0.8,-5.7) 17(0,-5.7) 18(0.8,-5.7) 19(1.6,-5.7) 20(2.4,-5.7) 21(3.2,-5.7) 22(4,-5.7) 34(4,5.7) 35(3.2,5.7) 36(2.4,5.7) 37(1.6,5.7) 38(0.8,5.7) 39(0,5.7) 40(-0.8,5.7) 41(-1.6,5.7) 42(-2.4,5.7) 43(-3.2,5.7) 44(-4,5.7)
  silkscreen extent -7.17,-5.05 5.05,5.05, body extent -6.55,-6.55 6.55,6.55, height 0.25
FP-NCP18-0_15-IPC_A [mm]
  rect 1.306x1.058 smd paste+0 mask+0: 1(-0.776,0) 2(0.776,0)
  silkscreen extent -1.43,-0.93 1.43,0.93, body extent -1.93,-1.03 1.93,1.03, height 0.25
FP-RM-8-IPC_B [mm]
  rect 1.754x0.476 smd paste+0 mask+0: 1(-2.05,0.975)
  rrect100% 1.754x0.476 smd paste+0 mask+0: 2(-2.05,0.325) 3(-2.05,-0.325) 4(-2.05,-0.975) 5(2.05,-0.975) 6(2.05,-0.325) 7(2.05,0.325) 8(2.05,0.975)
  silkscreen extent -0.67,-1.5 0.67,1.5, body extent -3.18,-1.75 3.18,1.75, height 0.25
FP-RMCF0603-IPC_B [mm]
  rect 1.006x0.958 smd paste+0 mask+0: 1(-0.701,0) 2(0.701,0)
  silkscreen extent -1.2,-0.88 1.2,-0.88, body extent -1.45,-0.73 1.45,0.73, height 0.25
FP-SMAJ-CA-MFG [mm]
  rect 2.1x1.8 smd paste+0 mask+0: 1(-2.2,0) 2(2.2,0)
  silkscreen extent -2.3,-1.4 2.3,1.4, body extent -3.35,-1.5 3.35,1.5, height 0.25
FP-TAJA-MFG [mm]
  rect 1.4x1.8 smd paste+0 mask+0: 1(-1.3,0) 2(1.3,0)
  silkscreen extent -0.23,-0.9 2.9,0.9, body extent -2.1,-1 2.1,1, height 0.25
FP-TMC4671-LA-IPC_A [mm]
  round 0.173 smd paste+0 mask+0: 1(-5.236,2.6)
  rrect100% 0.961x0.192 smd paste+0 mask+0: 2(-5.226,2.2) 3(-5.226,1.8) 4(-5.226,1.4) 5(-5.226,1) 6(-5.226,0.6) 7(-5.226,0.2) 8(-5.226,-0.2) 9(-5.226,-0.6) 10(-5.226,-1) 11(-5.226,-1.4) 12(-5.226,-1.8) 13(-5.226,-2.2) 14(-5.226,-2.6) 39(5.226,-2.6) 40(5.226,-2.2) 41(5.226,-1.8) 42(5.226,-1.4) 43(5.226,-1) 44(5.226,-0.6) 45(5.226,-0.2) 46(5.226,0.2) 47(5.226,0.6) 48(5.226,1) 49(5.226,1.4) 50(5.226,1.8) 51(5.226,2.2) 52(5.226,2.6)
  rrect100% 0.192x0.961 smd paste+0 mask+0: 15(-4.6,-3.226) 16(-4.2,-3.226) 17(-3.8,-3.226) 18(-3.4,-3.226) 19(-3,-3.226) 20(-2.6,-3.226) 21(-2.2,-3.226) 22(-1.8,-3.226) 23(-1.4,-3.226) 24(-1,-3.226) 25(-0.6,-3.226) 26(-0.2,-3.226) 27(0.2,-3.226) 28(0.6,-3.226) 29(1,-3.226) 30(1.4,-3.226) 31(1.8,-3.226) 32(2.2,-3.226) 33(2.6,-3.226) 34(3,-3.226) 35(3.4,-3.226) 36(3.8,-3.226) 37(4.2,-3.226) 38(4.6,-3.226) 53(4.6,3.226) 54(4.2,3.226) 55(3.8,3.226) 56(3.4,3.226) 57(3,3.226) 58(2.6,3.226) 59(2.2,3.226) 60(1.8,3.226) 61(1.4,3.226) 62(1,3.226) 63(0.6,3.226) 64(0.2,3.226) 65(-0.2,3.226) 66(-0.6,3.226) 67(-1,3.226) 68(-1.4,3.226) 69(-1.8,3.226) 70(-2.2,3.226) 71(-2.6,3.226) 72(-3,3.226) 73(-3.4,3.226) 74(-3.8,3.226) 75(-4.2,3.226)
  rrect100% 0.192x0.96 smd paste+0 mask+0: 76(-4.6,3.226)
  rect 9.1x5.1 smd paste-1000 mask+0: 77(0,0)
  Top Layer region: -5.706,2.696 -4.842,2.696 -4.805,2.689 -4.774,2.668 -4.753,2.637 -4.746,2.6 -4.746,2.6 -4.759,2.552 -4.794,2.517 -4.842,2.504 -4.842,2.504 -5.706,2.504
  silkscreen extent -6.63,-3.25 5.25,3.25, body extent -6.21,-4.21 6.21,4.21, height 0.25
HDR1X2 [mm] "Connector; Header; 2 Position"
  rect 1.5x1.5 hole 0.9: 1(0,0)
  round 1.5 hole 0.9: 2(2.54,0)
  silkscreen extent -1.27,-1.27 3.81,1.27
HDR1X3 [mm] "Connector; Header; 3 Position"
  rect 1.5x1.5 hole 0.9: 1(0,0)
  round 1.5 hole 0.9: 2(2.54,0) 3(5.08,0)
  silkscreen extent -1.27,-1.27 6.35,1.27
HDR2X3 [mm] "Connector; Header; 3x2 Position"
  rect 1.5x1.5 hole 0.9: 1(0,0)
  round 1.5 hole 0.9: 2(0,2.54) 3(2.54,0) 4(2.54,2.54) 5(5.08,0) 6(5.08,2.54)
  silkscreen extent -1.27,-1.27 6.35,3.81
HDR2X4 [mm] "Connector; Header; 4x2 Position"
  rect 1.5x1.5 hole 0.9: 1(0,0)
  round 1.5 hole 0.9: 2(0,2.54) 3(2.54,0) 4(2.54,2.54) 5(5.08,0) 6(5.08,2.54) 7(7.62,0) 8(7.62,2.54)
  silkscreen extent -1.27,-1.27 8.89,3.81
LTST-C190TBKT-2_V [mm] "SMD, 2-Leads, Body 1.6x0.8mm"
  rect 0.8x0.8 smd: 1(-0.75,0) 2(0.75,0)
  silkscreen extent 1.65,-0.4 1.65,0.4, body extent -0.8,-0.4 0.8,0.4, height 0.8
PCBComponent_1#1 [mil]
  round 30 smd paste-99999: 1(0,0)
PCBComponent_1#2 [mil]
  round 30 smd paste-99999: 1(-23.62,0)
PCBComponent_1#3 [mil]
  round 30 smd paste-99999: 1(-19.69,-19.68)
PTSM5 [mm]
  rect 1.575x1.575 / inner round 1.575 / far side rect 1.575x1.575 hole 1.05: 1(0,0)
  round 1.575 hole 1.05: 2(-2.5,0) 3(-5,0) 4(-7.5,0) 5(-10,0)
  silkscreen extent -12.1,-2.5 2.1,2.5, body extent -12.11,-2.5 2.11,2.5, height 7.5
PTSM6 [mm]
  rect 1.575x1.575 / inner round 1.575 / far side rect 1.575x1.575 hole 1.05: 1(0,0)
  round 1.575 hole 1.05: 2(-2.5,0) 3(-5,0) 4(-7.5,0) 5(-10,0) 6(-12.5,0)
  silkscreen extent -14.6,-2.5 2.1,2.5, body extent -14.62,-2.5 2.1,2.5, height 7.5
QFN37_7X7_TRI-M [mil]
  round 1 smd paste+0 mask+0: 1(-137,98.43)
  rrect75% 35x10 smd paste+0 mask+0: 2(-137,59.06) 3(-137,39.37) 4(-137,19.69) 5(-137,0) 6(-137,-19.68) 7(-137,-39.37) 8(-137,-59.05) 9(-137,-78.74) 10(-137,-98.42) 22(137,-98.42) 23(137,-78.74) 24(137,-59.05) 25(137,-19.68) 26(137,19.69) 27(137,59.06) 28(137,78.74) 29(137,98.43)
  rrect75% 10x35 smd paste+0 mask+0: 11(-98.43,-137) 12(-78.74,-137) 13(-59.06,-137) 14(-39.37,-137) 15(-19.69,-137) 16(0,-137) 17(19.68,-137) 18(39.37,-137) 19(59.06,-137) 20(78.74,-137) 21(98.43,-137) 30(78.74,137) 31(59.06,137) 32(39.37,137) 33(0,137) 34(-19.69,137) 35(-39.37,137) 36(-78.74,137) 37(-98.43,137)
  rect 161x161 smd paste-80 mask+0: 38(0,0)
  Top Layer region: -152,93.43 -152,103.43 -120.75,103.43 -119.31,103.14 -118.1,102.33 -117.29,101.11 -117,99.68 -117,99.68 -117,97.18 -117.29,95.74 -118.1,94.52 -119.31,93.71 -120.75,93.43 -120.75,93.43
  silkscreen extent -174,-174 174,174, body extent -138,-138 138,138, height 35
RESC1608X55X30ML15T15 [mm] "Chip Resistor, 2-Leads, Body 1.60x0.80mm, IPC Low Density"
  rect 0.9x1.05 smd: 1(-0.725,0) 2(0.725,0)
  body extent -0.87,-0.48 0.87,0.48, height 0.55
RESC1608X55X30NL15T15 [mm] "Chip Resistor, 2-Leads, Body 1.75x0.95mm, IPC Medium Density"
  rect 0.95x0.95 smd: 1(-0.75,0) 2(0.75,0)
  body extent -0.87,-0.48 0.87,0.48, height 0.55
RESC1609X55X30LL15T15 [mm] "Chip Resistor, 2-Leads, Body 1.75x0.95mm, IPC High Density"
  rect 0.75x0.85 smd: 1(-0.65,0) 2(0.65,0)
  body extent -0.87,-0.48 0.87,0.48, height 0.55
SHDRRA4W60P0X250_1X4_1170X750X510P [mm]
  rect 1.575x1.575 / inner round 1.575 / far side rect 1.575x1.575 hole 1.05: 1(0,0)
  round 1.575 hole 1.05: 2(-2.5,0) 3(-5,0) 4(-7.5,0)
  silkscreen extent -9.6,0 2.1,7.8, body extent -9.55,-0.3 2.17,7.2, height 5.02
SOT23_6L [mil] "SOT23_6L, 6-Leads, Body 3.60x2.9mm, Pitch 0.95mm"
  rect 44x24 smd: 1(-49.21,37.4) 2(-49.21,0) 3(-49.21,-37.4) 4(49.21,-37.4) 5(49.21,0) 6(49.21,37.4)
  silkscreen extent -109,-65 86,65, body extent -55,-57 55,57, height 44
SOT-223-DB3_N [mm] "SOT223, 4-Leads, Body 6.5x3.5mm, Pitch 2.3mm, Lead Span 7mm, IPC Medium Density"
  rect 2.2x1 smd: 1(-3,2.3) 2(-3,0) 3(-3,-2.3)
  rect 2.2x3.3 smd: 4(3,0)
  silkscreen extent -3.12,-3.35 1.6,3.47, body extent -1.85,-3.35 1.85,3.35, height 1.8
"TSON Advance_TOS" [mil]
  rect 26x15 smd paste+0 mask+0: 1(-70,38.39) 2(-70,12.8) 3(-70,-12.79) 4(-70,-38.39) 5(70,-38.39) 6(70,-12.79) 7(70,12.8) 8(70,38.39)
  Top Layer region: 57,49 57,-49 -26,-49 -26,49
  silkscreen extent -66,-66 66,66, body extent -65,-65 65,65, height 33
TSSOP-ST20_M [mm] "TSOP, 20-Leads, Body 6.5x4.4mm, Pitch 0.65mm, IPC Low Density"
  oval 2x0.35 smd: 1(-2.9,2.925) 2(-2.9,2.275) 3(-2.9,1.625) 4(-2.9,0.975) 5(-2.9,0.325) 6(-2.9,-0.325) 7(-2.9,-0.975) 8(-2.9,-1.625) 9(-2.9,-2.275) 10(-2.9,-2.925) 11(2.9,-2.925) 12(2.9,-2.275) 13(2.9,-1.625) 14(2.9,-0.975) 15(2.9,-0.325) 16(2.9,0.325) 17(2.9,0.975) 18(2.9,1.625) 19(2.9,2.275) 20(2.9,2.925)
  silkscreen extent -3.02,-3.3 1.5,3.78, body extent -2.25,-3.3 2.25,3.3, height 1.2
XT60+MR60 [mm]
  rrect50% 5x5 hole 4.3 paste-2539.97: 1(-6.35,-5.3) 1(-5.5,0) 2(0,0) 2(0.85,-5.3) 3(5.5,0)
  silkscreen extent -10.6,-9.35 10.2,4.6
XT-60 [mm] "Battery Connector"
  rect 6.8x6.8 hole 4.95: 1(4.394,4.039) 2(11.709,4.039)
  body extent 0.07,0.13 15.67,8.13, height 16.4

## Part data
*401: Colour=yellow, Manufacturer=POLOLU, Manufacturer Part Number="XT60 YELLOW", Maximum current=65A, Category="Power Supply Modules", ComponentLink1Description=http://static.tme.eu/products_pics/8/b/5/8b5040a8a5baf3e0e67386c2e3a9b903/913.jpg, ComponentLink1URL=http://static.tme.eu/products_pics/8/b/5/8b5040a8a5baf3e0e67386c2e3a9b903/913.jpg, Information="Product is not a working device, but only component", MinAmount=1, Multiples=1, Number of Pins=2, Price Type=NET, Pricing 1="1=2.08, 10=1.95 (USD)", Stock 1=29, SuppliedAmount=0, Supplier 1=TME, Supplier Part Number 1="XT-60 Connector", Type of robotics accessories="power connector", Unit=pcs, Weight=7.267
C101 C104 C106: library part CMP-2006-03015-2, "CAP CER 1000PF 100V 10% X7R 0603", Capacitance="1,000 pF", Manufacturer=KEMET, Manufacturer Part Number=C0603C102K1RACTU, Package=C0603C-CF, Temperature="-55°C to +125°C", Temperature Characteristic=X7R, Temperature Coefficient=30ppm/°C, Temperature Range High=+125°C, Temperature Range Low=-55°C, Tolerance=0.1, Voltage Rating="100 V", Automotive=Yes, Automotive Grade="Grade 1", Category=Cap, ComponentLink2Description=Datasheet, ComponentLink2URL=https://api.kemet.com/component-edge/download/datasheet/C0603C100J5GACAUTO.pdf, Device Class L1="Passive Components", Device Class L2=Capacitors, Device Class L3="Ceramic Capacitors", Digikey Description="CAP CER 1000PF 100V 10% X7R 0603", Height=0.87mm, Lead Free=Yes, Material=Ceramic, Mouser Description="Multilayer Ceramic Capacitors MLCC - SMD/SMT 100volts 1000pF X7R 10%", Octopart=https://octopart.com/c0603c102k1ractu-kemet-9138575, RoHS=TRUE
C102 C105 C107: library part CMP-2006-03007-2, "CAP CER 100PF 50V 10% X7R 0603", Capacitance="100 pF", Manufacturer=KEMET, Manufacturer Part Number=C0603C101K5RACTU, Package=C0603C-CF, Temperature="-55°C to +125°C", Temperature Characteristic=X7R, Temperature Coefficient=30ppm/°C, Temperature Range High=+125°C, Temperature Range Low=-55°C, Tolerance=0.1, Voltage Rating="50 V", Automotive=Yes, Automotive Grade="Grade 1", Category=Cap, ComponentLink2Description=Datasheet, ComponentLink2URL=https://api.kemet.com/component-edge/download/datasheet/C0603C100J5GACAUTO.pdf, Device Class L1="Passive Components", Device Class L2=Capacitors, Device Class L3="Ceramic Capacitors", Digikey Description="CAP CER 100PF 50V 10% X7R 0603", Height=0.87mm, Lead Free=Yes, Material=Ceramic, Mouser Description="Multilayer Ceramic Capacitors MLCC - SMD/SMT 50volts 100pF 10%", Octopart=https://octopart.com/c0603c101k5ractu-kemet-10561249, RoHS=TRUE
C103 C108 C109 C201 C207 C211 C212 C301 C302 C303 C305 C307 C308 C309 C310 C311 C312 C314 C317 C319 C320 C330 C506 C507 C508 C509 C512 C513 C514 C515: library part CMP-2100-03643-1, "Chip Capacitor, 0.1 uF, +/- 10%, 50 V, -55 to 125 degC, 0603 (1608 Metric), RoHS, Tape and Reel", Case Code (Imperial)=0603, Case Code (Metric)=1608, Dielectric=X7R, Dielectric Material=Ceramic, Insulation Resistance=10GR, Manufacturer=Murata, Max Operating Temperature=125degC, Min Operating Temperature=-55degC, Package Description="2-Pin Surface Mount Device, Body 1.6 x 0.8 mm", Package Quantity=1, Tolerance=10%, Voltage=50V, Capacitance=100nF, Case/Package=0603, Contact Plating=Tin, Datasheet URL=http://psearch.en.murata.com/capacitor/product/GRM188R71H104KA93%23.pdf, Datasheet Version=42675.0, Depth=0.8mm, Height=0.8mm, Lead Free=LeadFree, Length=1.6mm, Manufacturer URL=http://www.murata.com/, Material=Ceramic, Mount=SurfaceMount, Number of Pins=2, Package Reference=0603, Packaging=TapeandReel, Radiation Hardening=No, REACH SVHC=NoSVHC, RoHSCompliant=true, Termination=SMD/SMT, Thickness=0.035inch, Voltage Rating=50V, Voltage Rating (DC)=50V, Width=0.8mm
C202 C210: library part CMP-2006-00064-1, Manufacturer=Vitramon, Part Number=VJ0603Y222KXACW1BC
C203 C205 C206 C315: library part CMP-14477-000135-2, "None", Case Code (Imperial)=0603, Case Code (Metric)=1608, Dielectric=X7R, Max Operating Temperature=125°C, Min Operating Temperature=-55°C, Package Quantity=1, Tolerance=10%, Voltage=50V, Capacitance=470nF, Case/Package=0603, Construction=Flat, Depth=0.8mm, Halogen Free="Halogen Free", Height=0.8mm, Lead Free="Lead Free", Length=1.6mm, Mount="Surface Mount", Packaging="Tape and Reel", Radiation Hardening=No, RoHS Compliant=Yes, Series=M, Termination=SMD/SMT, Thickness=0.035inch, Voltage Rating=50V, Voltage Rating (DC)=50V, Width=0.031inch
C204: library part CMP-2006-03137-2, "CAP CER 0.022UF 100V X7R 0603", Capacitance="22,000 pF", Manufacturer=KEMET, Manufacturer Part Number=C0603C223K1RACTU, Package=C0603C-CF, Temperature="-55°C to +125°C", Temperature Characteristic=X7R, Temperature Coefficient=30ppm/°C, Temperature Range High=+125°C, Temperature Range Low=-55°C, Tolerance=0.1, Voltage Rating="100 V", Automotive=Yes, Automotive Grade="Grade 1", Category=Cap, ComponentLink2Description=Datasheet, ComponentLink2URL=https://api.kemet.com/component-edge/download/datasheet/C0603C100J5GACAUTO.pdf, Device Class L1="Passive Components", Device Class L2=Capacitors, Device Class L3="Ceramic Capacitors", Digikey Description="CAP CER 0.022UF 100V X7R 0603", Height=0.87mm, Lead Free=Yes, Material=Ceramic, Mouser Description="Multilayer Ceramic Capacitors MLCC - SMD/SMT 100volts 0.022uF 10% X7R", Octopart=https://octopart.com/c0603c223k1ractu-kemet-150702, RoHS=TRUE
C208 C209: library part CMP-14477-000078-3, "Multilayer Ceramic Capacitor 2.2uF 16V X7R 10% SMD 0603 T/R", Case/Package=0603, Max Operating Temperature=125°C, Min Operating Temperature=-55°C, Tolerance=10%, Voltage Rating=16V, Capacitance=2.2uF, Halogen Free="Halogen Free", Length=0.063inch, Mount="Surface Mount", Packaging="Tape and Reel", RoHS Compliant=Yes, Thickness=0.035inch, Voltage Rating (DC)=16V, Width=0.031inch
C304 C313: library part CMP-2007-01048-1, Manufacturer=Kemet, Part Number=C0805C475K4RACTU
C306 C316 C318: library part CMP-2000-05453-1, "Chip Capacitor, 100 nF, +/- 10%, 100 V, -55 to 1255 degC, 0805 (2012 Metric), RoHS, Tape and Reel", Capacitance=0.1µF, Manufacturer=TDK, Operating Temperature=-55degC~125degC, Package / Case=0805(2012Metric), Package Description="2-Pin Surface Mount Device, Body 2 x 1.25 mm", Package Reference=805, PCN Part Number=MLCCPartNumberChange30/Nov/2012, Ratings=-, Standard Package=1, Temperature Coefficient=X7R, Tolerance=±10%, Voltage - Rated=100V, Applications=GeneralPurpose, Catalog Drawings=CSERIES_2012-0805_1.45, Category=Capacitors, Datasheet URL=https://datasheet.ciiva.com/11788/0900766b80fc5cba-11788142.pdf, Datasheet Version=Jul-13, Family=CeramicCapacitors, Featured Product=C-SeriesMidVoltageMLCCs, Features=-, Height - Seated (Max)=-, Kits=SAMPLEKIT1008-ND-KITCAPCERMLCC100V-630V, Lead Spacing=-, Lead Style=-, Manufacturer URL=http://www.tdk.com/, Mounting Type=SurfaceMount,MLCC, Online Catalog=CSeries,MidVoltage, Other Names=445-1418-1, Packaging=CutTape(CT), Product Training Modules=HighCapacitanceReplacementSEAT,CCV,andTVCLDesignToolsGuidetoReplacinganElectrolyticCapacitorwithanMLCC, RoHS Information=RoHSCertificate-MLCC, Series=C, Size / Dimension="0.079\"Lx0.049\"W(2.00mmx1.25mm)", Thickness (Max)="0.057\"(1.45mm)"
C321 C327 C505 C510 C511: library part CMP-13271-004127-1, "Cap Ceramic 1uF 25V X5R ±10% Pad SMD 0603 +85°C T/R", Case Code (Imperial)=0603, Case Code (Metric)=1608, Dielectric=X5R, Max Operating Temperature=85°C, Min Operating Temperature=-55°C, Package Quantity=1, Tolerance=10%, Voltage=25V, Capacitance=1uF, Case/Package=0603, Contact Plating=Tin, Depth=0.8mm, Height=0.8mm, Lead Free="Lead Free", Length=1.6mm, Material=Ceramic, Mount="Surface Mount", Packaging="Tape and Reel", Radiation Hardening=No, Thickness=0.035inch, Voltage Rating=25V, Voltage Rating (DC)=25V, Width=0.031inch
C322 C323 C324: library part CMP-05427-002152-1, "CAP ALUM 220UF 20% 35V SMD", Capacitance=220uF, Case/Package=Radial, ESR (Equivalent Series Resistance)=150mR, Leakage Current=3uA, Max Operating Temperature=105°C, Min Operating Temperature=-40°C, Package Quantity=500, Ratings=AEC-Q200, Ripple Current=670mA, Tolerance=20%, Voltage=35V, Construction=Cylindrical, Contact Plating=Tin, Diameter=10mm, Height=10.2mm, Height - Seated (Max)=0.402inch, Impedance=150mR, Lead Free="Lead Free", Length=10.5mm, Life (Hours)=1000Hour, Material=Aluminium, Mount="Surface Mount", Packaging="Tape and Reel", Radiation Hardening=No, Reach SVHC Compliant=Yes, Ripple Current (AC)=670mA, RoHS Compliant=Yes, Series=FC, Termination=SMD/SMT, Voltage Rating=35V, Voltage Rating (DC)=35V, Width=900um
C329: library part CMP-2000-07217-2, "10uF 10V  ±10% 3Ω 1206  SMD Tantalum Capacitor", Case Code (Imperial)=1206, Case Code (Metric)=3216, Dielectric Material=Tantalum, ESR (Equivalent Series Resistance)=3R, Leakage Current=1uA, Max Operating Temperature=125°C, Min Operating Temperature=-55°C, Package Quantity=1, Tolerance=10%, Voltage=10V, Capacitance=10uF, Case/Package=1206, Construction=Flat, Depth=1.6mm, Dissipation Factor=6%, Features="General Purpose", Height=1.6mm, Height - Seated (Max)=0.071inch, Lead Free="Lead Free", Length=3.2mm, Mount="Surface Mount", Number of Pins=2, Packaging="Tape and Reel", Polarity=Polar, Q Factor=6, Radiation Hardening=No, REACH SVHC="No SVHC", RoHS Compliant=Yes, Series=TAJ, Termination=SMD/SMT, Voltage Rating=10V, Voltage Rating (DC)=10V, Width=1.6mm
C501 C502 C503 C504: library part CMP-03020-006972-1, "C0603 18 pF X8R 30ppm/°C 10.00% 16 V", Capacitance="18 pF", Manufacturer=KEMET, Manufacturer Part Number=C0603C180K4HAC7867, Package=C0603C-CF, Temperature="-55°C to +125°C", Temperature Characteristic=X8R, Temperature Coefficient=30ppm/°C, Temperature Range High=+125°C, Temperature Range Low=-55°C, Tolerance=0.1, Voltage Rating="16 V", Automotive=Yes, Automotive Grade="Grade 1", Category=Cap, ComponentLink2Description=Datasheet, ComponentLink2URL=https://api.kemet.com/component-edge/download/datasheet/C0603C100J5GACAUTO.pdf, Device Class L1="Passive Components", Device Class L2=Capacitors, Device Class L3="Ceramic Capacitors", Height=0.87mm, Lead Free=Yes, Material=Ceramic, Octopart=https://octopart.com/c0603c180k4hac7867-kemet-88085547, RoHS=TRUE
C601 C602 C603: library part CMP-13271-002674-1, "Cap Ceramic 2.2uF 100V X7R ±10% SMD 1210 +125°C Embossed T/R", Case Code (Imperial)=1210, Case Code (Metric)=3225, Dielectric=X7R, Max Operating Temperature=125°C, Min Operating Temperature=-55°C, Package Quantity=1, Tolerance=10%, Voltage=100V, Capacitance=2.2uF, Case/Package=1210, Contact Plating=Tin, Depth=2.5mm, Height=2.5mm, Length=3.2mm, Mount="Surface Mount", Packaging="Tape and Reel", Radiation Hardening=No, Thickness=0.106inch, Voltage Rating=100V, Width=0.098inch
D301 D302: library part CMP-22017-000005-2, "LED GREEN CLEAR CHIP SMD", Case Code (Imperial)=0603, Case Code (Metric)=1608, Color=Green, Forward Current=30mA, Forward Voltage=2.1V, Lens Color=Colorless, Max Operating Temperature=85°C, Min Operating Temperature=-55°C, Package Quantity=1, Power Dissipation=100mW, Reverse Voltage=5V, Test Current=10mA, Voltage=2V, Case/Package=0603, Depth=0.8mm, Dominant Wavelength=569nm, Height=0.8mm, Illumination Color=Green, Lead Free="Lead Free", Length=1.6mm, Lens Style=Clear, Lens Transparency=Clear, Luminous Intensity=6mcd, Mount="Surface Mount", Number of Elements=1, Number of LEDs=1, Number of Pins=2, Packaging="Tape and Reel", Power Rating=100mW, Radiation Hardening=No, Viewing Angle=130°, Wavelength=565nm, Width=0.8mm
D401: library part CMP-1486-00005-1, "TVS Diode WE-TVS-HS, VRWM=5V", Manufacturer="Wuerth Elektronik", Reverse Stand Off Voltage=5V, ComponentLink1Description="Manufacturer URL", ComponentLink1URL=http://www.we-online.com, ComponentLink2Description=Datasheet, ComponentLink2URL=http://katalog.we-online.de/kataloge/eisos/media/pdf/824001.pdf, PackageReference=SOT23_6L, PartNumber=824001
D402: library part CMP-08607-000009-1, "TVS DIODE 36V 58.1V DO214AC", Breakdown Voltage=40V, Clamping Voltage=58.1V, Manufacturer="Littelfuse Inc", Max Junction Temp=+150°C, Package=SMAJ-CA, Peak Pulse Current=6.9A, Peak Pulse Power=400W, Reverse Standoff Voltage=36V, Temperature="-65°C to +150°C", Temperature Range Low=-65°C, Automotive=No, Category=Diode, ComponentLink2Description=Datasheet, ComponentLink2URL=https://www.littelfuse.com/~/media/electronics/datasheets/tvs_diodes/littelfuse_tvs_diode_smaj_datasheet.pdf.pdf, Device Class L1="Circuit Protection", Device Class L2="TVS Diodes", Device Class L3=unset, Digikey Description="TVS DIODE 36V 58.1V DO214AC", Direction=Bidirectional, Height=2.29mm, Lead Free=Yes, Manufacturer Part Number=SMAJ36CA, Mouser Description="In a Pack of 25, Littelfuse SMAJ36CA, Bi-Directional TVS Diode, 400W, 2-Pin DO-214AC", Number Of Channels=1, Octopart=https://octopart.com/smaj36ca-littelfuse-350098, RoHS=TRUE, Temperature Range High=+150°C
D501 D502: library part CMP-1674-00011-2, "LED RED CLEAR CHIP SMD", Case Code (Imperial)=0603, Case Code (Metric)=1608, Color=Red, Forward Current=30mA, Forward Voltage=2.4V, Lens Color=Colorless, Max Operating Temperature=85°C, Min Operating Temperature=-55°C, Package Quantity=1, Power Dissipation=75mW, Reverse Voltage=5V, Test Current=20mA, Case/Package=0603, Depth=0.8mm, Dominant Wavelength=631nm, Height=0.8mm, Illumination Color=Red, Lead Free="Lead Free", Length=1.6mm, Lens Style=Diffused, Lens Transparency=Clear, Luminous Intensity=54mcd, Mount="Surface Mount", Number of Elements=1, Number of LEDs=1, Number of Pins=2, Packaging="Tape and Reel", Power Rating=75mW, Radiation Hardening=No, Viewing Angle=130°, Wavelength=639nm, Width=0.8mm
DS501 DS502 DS503 DS504: library part CMP-1674-00010-1, "Single Color Chip LED, 2.8 to 3.8 V, 28 to 180 mcd, -20 to 80 degC, 2-Pin SMD, RoHS, Tape and Reel", Case\Package=DFN, Max Operating Temperature="125 degC", Max Supply Voltage="3.6 V", Min Operating Temperature="-40 degC", Min Supply Voltage="2.1 V", Nominal Supply Voltage="3 V", ComponentLink1Description="Manufacturer URL", ComponentLink1URL=http://www.us.liteon.com/, ComponentLink2Description=Datasheet, ComponentLink2URL=http://optoelectronics.liteon.com/upload/download/DS-22-99-0224/S_110_LTST-C190TBKT(0630).pdf, DatasheetVersion="Rev. K, 08/2011", Height="1.1 mm", Interface=Serial, Length="3 mm", Mount="Surface Mount", PackageDescription="2-Pin Surface Mount Device, Body 1.6 x 0.8 mm", PackageReference=C190TBKT-2, Packaging="Cut Tape", Pins=6, REACH SVHC="No SVHC", RoHSCompliant=true, Width="3 mm"
FB101 FB401: library part CMP-0220-00181-2, "FERRITE BEAD 600 OHM 0603 1LN", Case Code (Imperial)=0603, Case Code (Metric)=1608, Case/Package=SMD/SMT, Current Rating=1A, DC Resistance (DCR)=200mR, Inductance=0.36H, Max Operating Temperature=125°C, Min Operating Temperature=-55°C, Package Quantity=1, Test Frequency=100MHz, Tolerance=25%, Core Material=Ferrite, Depth=0.8mm, Height=0.8mm, Impedance=600R, Lead Free="Lead Free", Length=1.6mm, Material=Ferrite, Max Current Rating=1A, Max DC Current=1A, Mount="Surface Mount", Number of Lines=1, Packaging="Tape and Reel", Resistance=200mR, RoHS Compliant=Yes, Series=WE-CBF, Termination=SMD/SMT, Weight=0.000141oz, Width=0.8mm
J401: library part CMP-1502-03253-1, "Micro USB 2.0 Type B Receptacle WR-COM, Horizontal, SMT, with Pads and Pegs", Contact Resistance=30mOhm, Manufacturer="Wurth Elektronik", Operating Temperature=-40to105degC, Rated Current=1A, Working Voltage=30VAC, Connector Type=MicroUSB2.0TypeB, Datasheet URL=https://katalog.we-online.de/em/datasheet/629105136821.pdf, Gender=Receptacle, Manufacturer URL=http://www.we-online.de, Mounting Technology=SMT, Orientation=Horizontal, Package Reference=629105136821, Packaging=TapeandReel, Part Number=629105136821, Publisher=WurthElektronik
J402: library part 1778641, "PCB header, nominal cross section: 0.5 mm?, color: black, nominal current: 6 A, rated voltage (III/2): 160 V, contact surface: Tin, type of contact: Male connector, Number of potentials: 4, Number of rows: 1, Number of positions per row: 4, number of connections: 4, product range: PTSM 0,5/..-HH-THR, pitch: 2.5 mm, mounting: THR soldering, pin layout: Linear pinning, solder pin [P]: 2.1 mm, Stecksystem: COMBICON COMPACT PTSM, Locking: without, type of packaging: 32 mm wide tape", Manufacturer_Name="Phoenix Contact", Mouser Part Number=651-1778641, Arrow Part Number=1778641, Arrow Price/Stock=https://www.arrow.com/en/products/1778641/phoenix-contact?region=nac, Datasheet Link=http://www.phoenixcontact.com/de/produkte/1778641/pdf, Geometry.Height=5.1mm, Manufacturer_Part_Number=1778641, Mouser Price/Stock=https://www.mouser.co.uk/ProductDetail/Phoenix-Contact/1778641?qs=i0qWf6NAoDs%252BwkQoFV1ycQ%3D%3D
J403 J404: library part 1778586, "PCB header, nominal cross section: 0.5 mm?, color: black, nominal current: 6 A, rated voltage (III/2): 160 V, contact surface: Tin, type of contact: Male connector, Number of potentials: 6, Number of rows: 1, Number of positions per row: 6, number of connections: 6, product range: PTSM 0,5/..-HH-THR, pitch: 2.5 mm, mounting: THR soldering, pin layout: Linear pinning, solder pin [P]: 2.1 mm, Stecksystem: COMBICON COMPACT PTSM, Locking: without, type of packaging: 32 mm wide tape"
J405: library part 1778599, "PCB header, nominal cross section: 0.5 mm?, color: black, nominal current: 6 A, rated voltage (III/2): 160 V, contact surface: Tin, type of contact: Male connector, Number of potentials: 5, Number of rows: 1, Number of positions per row: 5, number of connections: 5, product range: PTSM 0,5/..-HH-THR, pitch: 2.5 mm, mounting: THR soldering, pin layout: Linear pinning, solder pin [P]: 2.1 mm, Stecksystem: COMBICON COMPACT PTSM, Locking: without, type of packaging: 32 mm wide tape"
M601 M602 M603 M604 M605 M606: "No Description Available", Mfr_Name="Toshiba Electronic Devices & Storage Corp.", RefDes=RefDes, Type=Type
P403 P406: library part "Header 2", "Header, 2-Pin", LatestRevisionDate=17-Jul-2002, LatestRevisionNote="Re-released for DXP Platform.", Publisher="Altium Limited"
P404: library part "Header 3X2", "Header, 3-Pin, Dual row", LatestRevisionDate=17-Jul-2002, LatestRevisionNote="Re-released for DXP Platform.", Publisher="Altium Limited"
P405: library part "Header 4X2", "Header, 4-Pin, Dual row", LatestRevisionDate=17-Jul-2002, LatestRevisionNote="Re-released for DXP Platform.", Publisher="Altium Limited"
P408 P409: library part "Header 3", "Header, 3-Pin", LatestRevisionDate=17-Jul-2002, LatestRevisionNote="Re-released for DXP Platform.", Publisher="Altium Limited"